# Altium PCB Portable_FIlter.PcbDoc
Units mil, origin at the board's own origin, x right, y up, seen from the top; angles counter-clockwise.
Board outline 5715 x 4225 mil, 2 copper layers (Top Layer, Bottom Layer); 66 components, 36 nets, 177 pads, 23 vias.
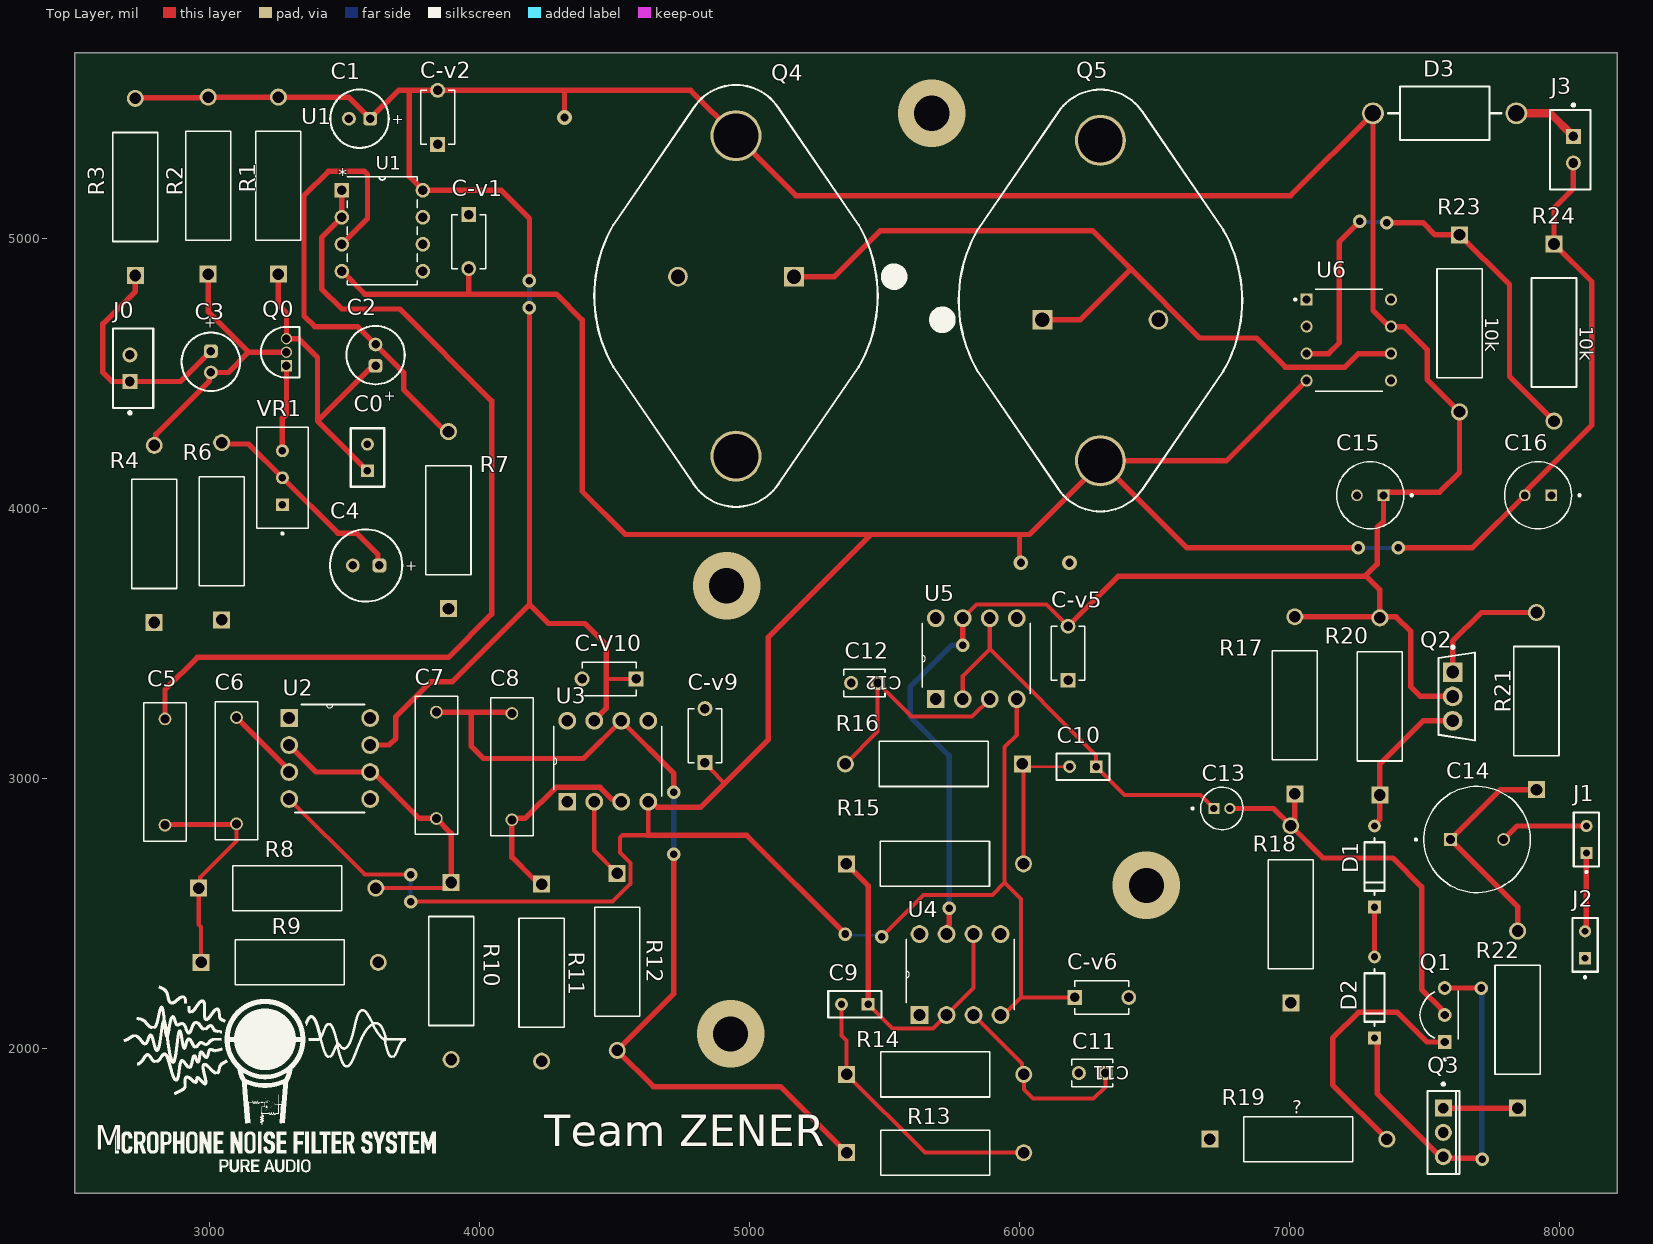
[diagram p0: Top Layer view]
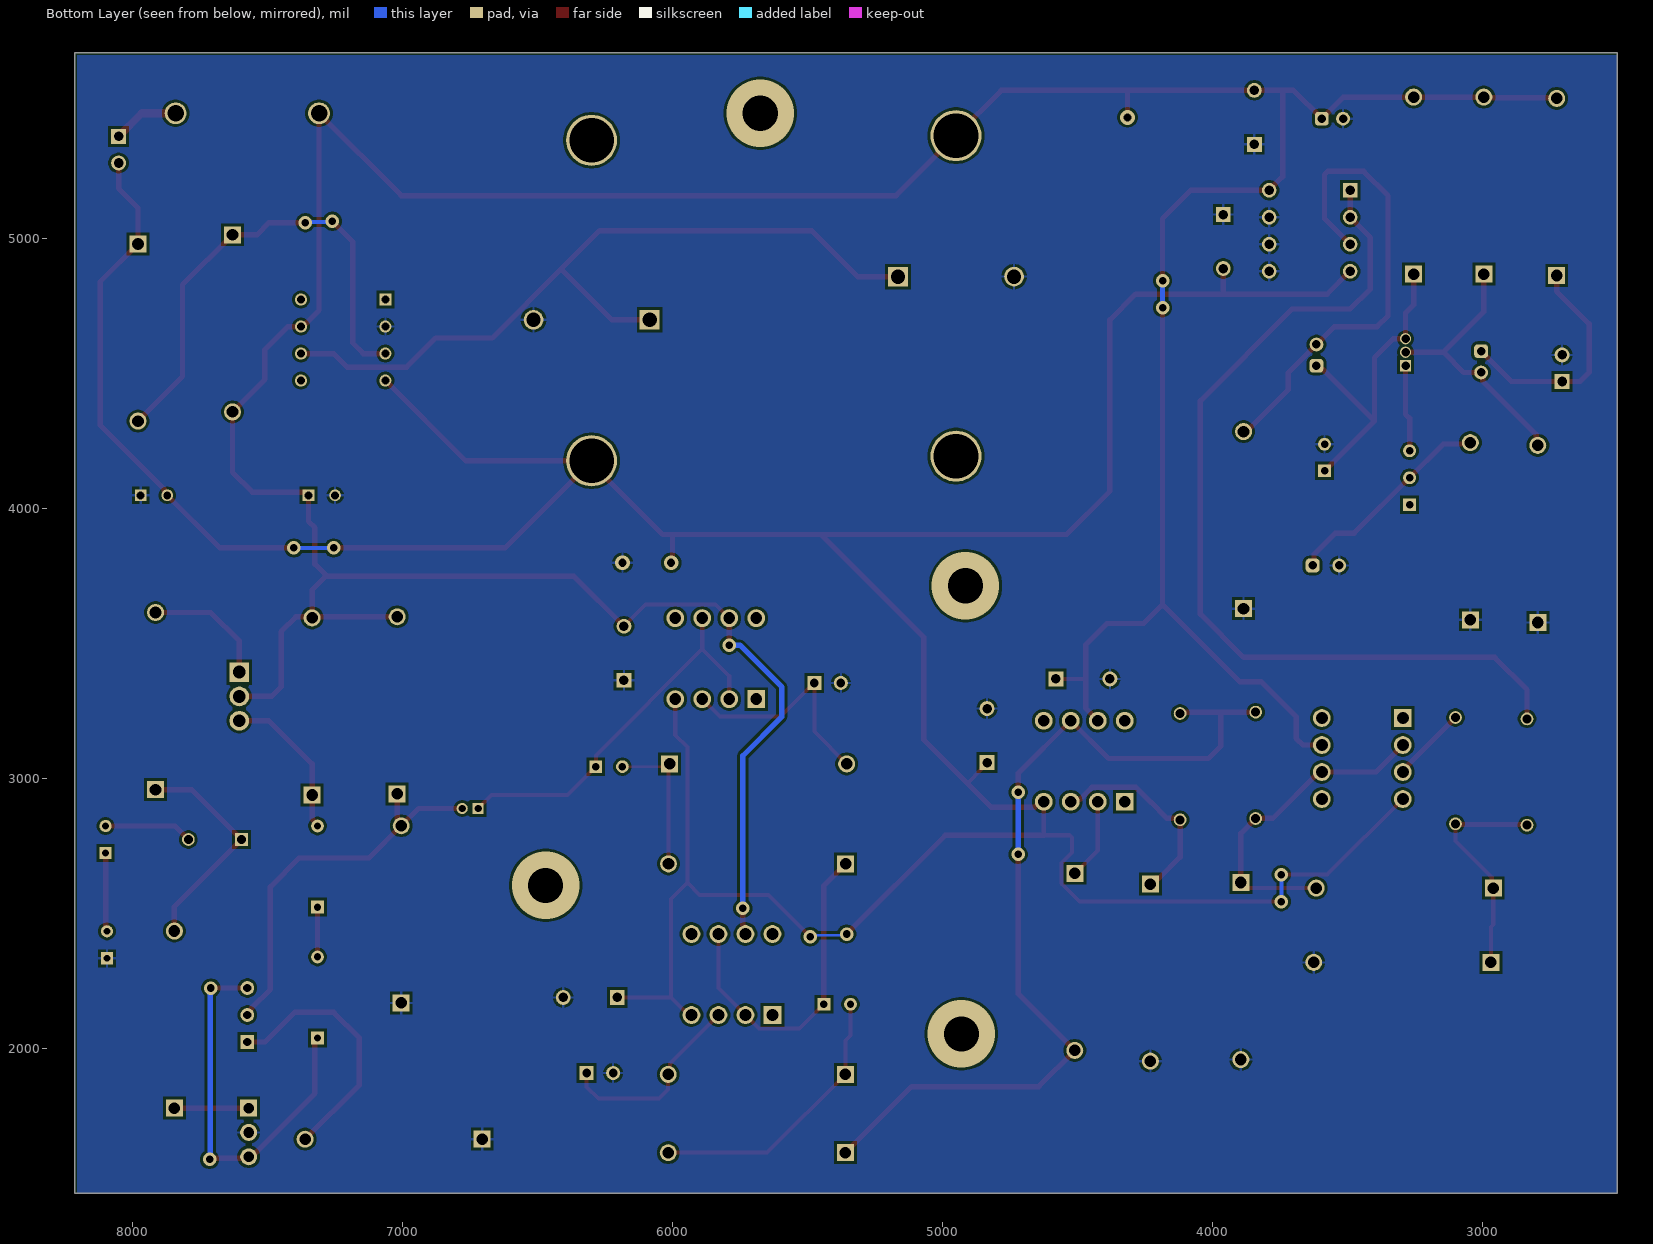
[diagram p1: Bottom Layer view, seen from below]
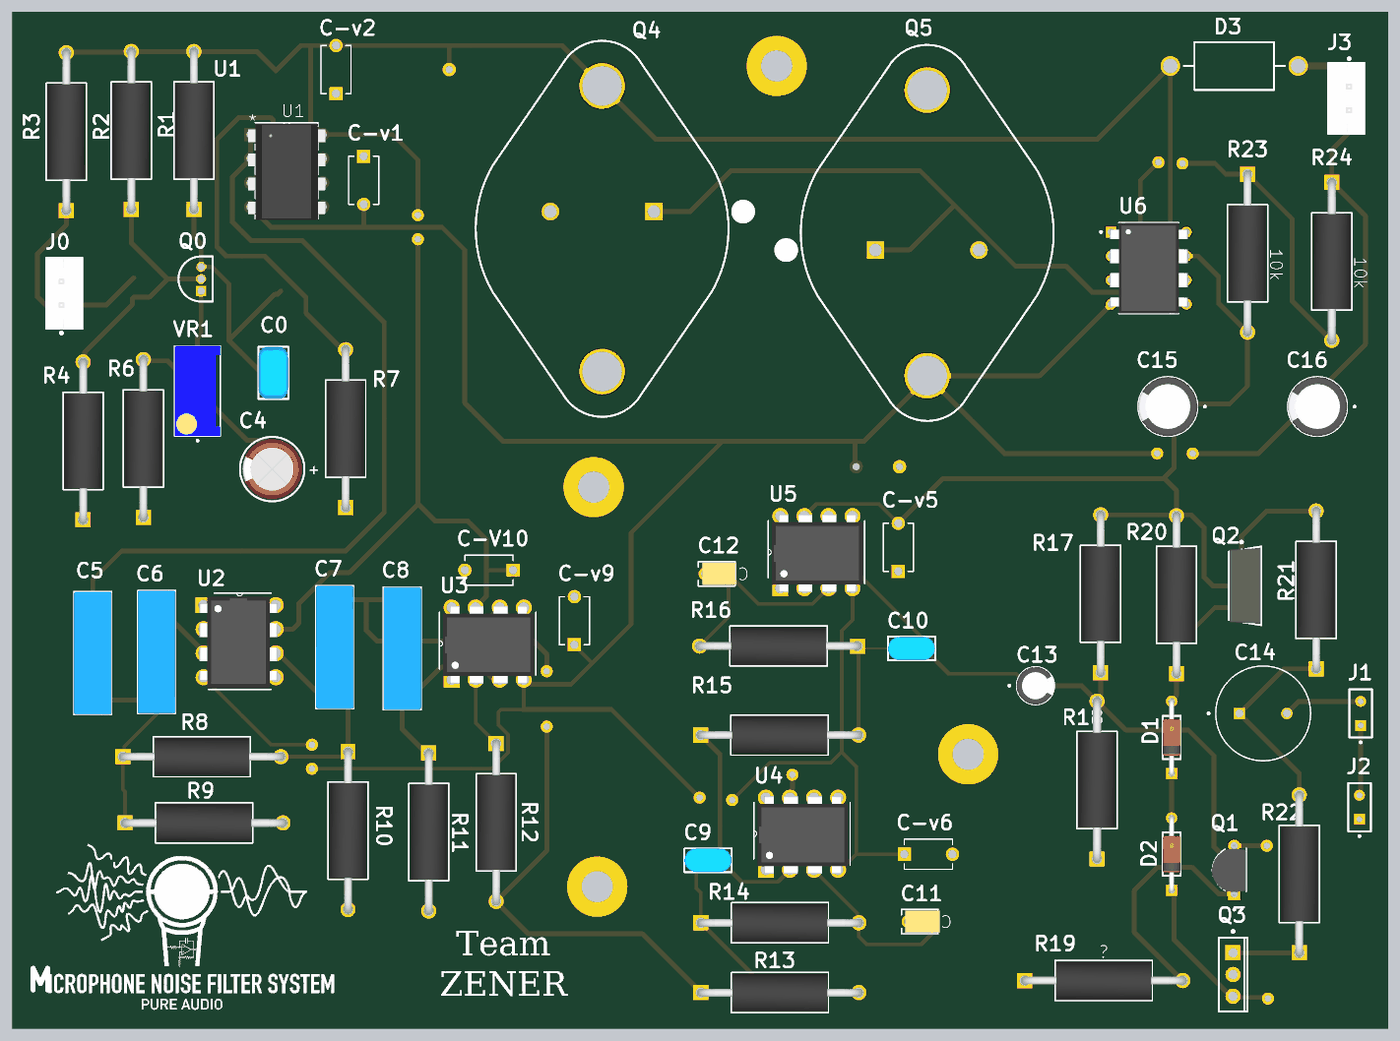
[diagram p2: 3D render of the assembled board from above, using the file's embedded part models]

## Layer stack, top to bottom
Top Solder: solder mask 0.4, Solder Resist, Dk 3.5
Top Layer: signal copper 1.4
Dielectric 1: dielectric 12.6, FR-4, Dk 4.8
Bottom Layer: signal copper 1.4
Bottom Solder: solder mask 0.4, Solder Resist, Dk 3.5

## Board outline
2500,1465 8215,1465 8215,5690 2500,5690

## Design rules (kind name [scope] priority, off if disabled: settings)
Clearance [All] p1: gap=10 ignorepadtopadclearanceinfootprint=FALSE
PolygonConnect [All] p1: connectstyle=Relief reliefconductorwidth=10 reliefentries=4 polygonreliefangle="90 Angle" airgapwidth=10
RoutingVias [All] p1: holewidth=28 width=50 viastyle="Through Hole" minholewidth=28 minwidth=50 maxholewidth=28 maxwidth=50
SolderMaskExpansion [All] p1: expansion=0 istentingtop=FALSE
SupplyNets "Schematic Supply Nets_2" [InNet('+12')] p1: voltage=0.000
SupplyNets "Schematic Supply Nets_1" [InNet('-12')] p2: voltage=0.000
SupplyNets "Schematic Supply Nets" [InNet('GND')] p3: voltage=0.000
Width [All] p1: maxlimit=20 minlimit=10 preferedwidth=20
30 further rules are at their usual default settings.

## Components (designator, comment, footprint, x,y, rotation, side; value= is the part's Value field where it differs from the comment)
C0 "0.1u" FP-RCE2A2-MFG 3585,4190 r90 top
C1 "10u" WCAP-ATLL_D5H11 53555.63,55445 r0 top
C2 "10u" WCAP-ATLL_D5H11 53615,-45430.63 r270 top
C3 "10u" WCAP-ATLL_D5H11 -46995,54544.37 r90 top
C4 "33u" WCAP-ATG5_D6.3H11 3580,3790 r0 top
C5 "470n" CAPRR1000W60L1300T400H900 2835,3025 r270 top
C6 "470n" CAPRR1000W60L1300T400H900 3100,3030 r90 top
C7 "470n" CAPRR1000W60L1300T400H900 3840,3050 r90 top
C8 "470n" CAPRR1000W60L1300T400H900 4120,3045 r270 top
C9 "15n" FP-RDE0P1-MFG 5390,2165 r180 top
C10 "15n" FP-RDE0P1-MFG 6235,3045 r180 top
C11 "10n" K103K10X7RF53L2_VIS 6318.43,1910 r180 top
C12 "10n" K103K10X7RF53L2_VIS 5475,3355 r180 top
C13 "3.3uF" CAPPRD150W45D400H700 6749.53,2890 r0 top
C14 "1000uF" CAPPRD500W60D1000H2500 7695,2775 r0 top
C15 "100uF" CAPPRD250W50D630H1120 7299.21,4050 r180 top
C16 "100uF" CAPPRD250W50D630H1120 7920.79,4050 r180 top
C-v1 "100nF" CAPRR508W50L508T318H762 3960,4990 r270 top
C-v2 "100nF" CAPRR508W50L508T318H762 3845,5450 r90 top
C-v5 "100nF" CAPRR508W50L508T318H762 6180,3465 r90 top
C-v6 "100nF" CAPRR508W50L508T318H762 6305,2190 r0 top
C-v9 "100nF" CAPRR508W50L508T318H762 4835,3160 r90 top
C-V10 "100nF" CAPRR508W50L508T318H762 4480,3370 r180 top
D1 "1N4148" FP-017AG-MFG 7315,2675 r90 top
D2 "1N4148" FP-017AG-MFG 7315,2190 r90 top
D3 "1N5408G" ONSC-AXIAL_LEAD-2-267-05_V 7575,5465 r0 top
J0 "B2B-EH(LF)(SN)" FP-B2B-EH_LF_SN-MFG 2716.81,4520.79 r90 top
J1 "TD-101-X-A" SAMTEC_TD-101-X-A 8100,2775 r0 top
J2 "TD-101-X-A" SAMTEC_TD-101-X-A 8095,2385 r0 top
J3 "B2B-EH(LF)(SN)" FP-B2B-EH_LF_SN-MFG 8040,5330 r270 top
Q0 "2N3904BU" FAIR-TO-92 3285,4530 r90 top
Q1 "2N2222A" TO92254P470H750-3 7483.27,2125 r90 top
Q2 "BD1396STU" FP-340AS-MFG 7620,3305 r0 top
Q3 "BD140" ONSC-TO-225-3-77-09 7570,1690 r0 top
Q4 "2N3055G" ONSC-TO-204-3-1-07 4950.04,4788.54 r270 top
Q5 "MJ2955G" ONSC-TO-204-3-1-07 6300,4771.5 r90 top
R1 "2k" RES_VISHAY_HVR37_VIS 3255,4869 r90 top
R2 "27k" RES_VISHAY_HVR37_VIS 2995,4869 r90 top
R3 "15k" RES_VISHAY_HVR37_VIS 2725,4864 r90 top
R4 "18k" RES_VISHAY_HVR37_VIS 2795,3579 r90 top
R6 "1.5k" RES_VISHAY_HVR37_VIS 3045,3589 r90 top
R7 "100k" RES_VISHAY_HVR37_VIS 3885,3630 r90 top
R8 "30k" RES_VISHAY_HVR37_VIS 2960,2595 r0 top
R9 "8.2k" RES_VISHAY_HVR37_VIS 2969,2320 r0 top
R10 "10k" RES_VISHAY_HVR37_VIS 3895,2616 r270 top
R11 "20k" RES_VISHAY_HVR37_VIS 4230,2610 r270 top
R12 "12k" RES_VISHAY_HVR37_VIS 4510,2650 r270 top
R13 "1.3k" RES_VISHAY_HVR37_VIS 5360,1615 r0 top
R14 "1.3k" RES_VISHAY_HVR37_VIS 5360,1905 r0 top
R15 "1.3k" RES_VISHAY_HVR37_VIS 5359,2685 r0 top
R16 "1.3k" RES_VISHAY_HVR37_VIS 6011,3055 r180 top
R17 "82k" RES_VISHAY_HVR37_VIS 7020,2944 r90 top
R18 "15k" RES_VISHAY_HVR37_VIS 7005,2170 r90 top
R19 "100" RES_VISHAY_HVR37_VIS 6705,1665 r0 top
R20 "820" RES_VISHAY_HVR37_VIS 7335,2940 r90 top
R21 "1" RES_VISHAY_HVR37_VIS 7915,2960 r90 top
R22 "1" RES_VISHAY_HVR37_VIS 7845,1780 r90 top
R23 "10k" RES_VISHAY_HVR37_VIS 7630,5015 r270 top
R24 "10k" RES_VISHAY_HVR37_VIS 7980,4981 r270 top
U1 "NE5532P" P8 3790,4880 r0 top
U2 "OP07CPZ" DIP254P762X508-8 3595,2925 r0 top
U3 "OP07CPZ" DIP254P762X508-8 4625,3215 r90 top
U4 "OP07CPZ" DIP254P762X508-8 5930,2425 r90 top
U5 "OP07CPZ" DIP254P762X508-8 5990,3595 r90 top
U6 "LM741CN/NOPB" DIP794W45P254L959H508Q8 7220,4625 r0 top
VR1 "100ohm" TRIM_3296W-1-101LF 3270,4115 r90 top

## Footprints (in the part's own frame and the unit in brackets; to place one, negate y for a bottom-side part, rotate by r counter-clockwise, add the part's x,y. Pads: shape width x height; smd on the part's side, far side on the other; paste and mask are expansions set on the pad)
CAPPRD150W45D400H700 [mm]
  round 1.05 hole 0.7: N(0.75,0)
  rect 1.05x1.05 / inner round 1.05 / far side rect 1.05x1.05 hole 0.7: P(-0.75,0)
  silkscreen extent -2.85,-2 2,2, body extent -2,-2 2,2, height 7
CAPPRD250W50D630H1120 [mm]
  round 1.1 hole 0.75: N(1.25,0)
  rect 1.1x1.1 hole 0.75: P(-1.25,0)
  silkscreen extent -4,-3.15 3.15,3.15, body extent -3.15,-3.15 3.15,3.15, height 11.2
CAPPRD500W60D1000H2500 [mm]
  round 1.2 hole 0.85: N(2.5,0)
  rect 1.2x1.2 / inner round 1.2 / far side rect 1.2x1.2 hole 0.85: P(-2.5,0)
  silkscreen extent -5.85,-5 5,5
CAPRR508W50L508T318H762 [mm]
  rect 1.398x1.398 / inner round 1.398 / far side rect 1.398x1.398 hole 0.89: 1(-2.54,0)
  round 1.398 hole 0.89: 2(2.54,0)
  silkscreen extent -2.54,-1.59 2.54,1.59
CAPRR1000W60L1300T400H900 [mm]
  round 1.2 hole 0.85: 1(-5,0) 2(5,0)
  silkscreen extent -6.5,-2 6.5,2, body extent -6.5,-2 6.5,2, height 9
DIP254P762X508-8 [mil]
  rect 66x66 / inner round 66 / far side rect 66x66 hole 44: 1(-300,300)
  round 66 hole 44: 2(-300,200) 3(-300,100) 4(-300,0) 5(0,0) 6(0,100) 7(0,200) 8(0,300)
  silkscreen extent -280,-50 -20,350, body extent -317,-42 7,335, height 210
DIP794W45P254L959H508Q8 [mm]
  rect 1.14x1.14 / inner round 1.14 / far side rect 1.14x1.14 hole 0.74 mask+0.102: 1(-3.97,3.81)
  round 1.14 hole 0.74 mask+0.102: 2(-3.97,1.27) 3(-3.97,-1.27) 4(-3.97,-3.81) 5(3.97,-3.81) 6(3.97,-1.27) 7(3.97,1.27) 8(3.97,3.81)
  silkscreen extent -5.13,-4.8 3.18,4.8, body extent -4.09,-4.79 4.1,4.79, height 5.08
FAIR-TO-92 [mm] "TO, 3-Leads, Body Dia 4.79mm, Pitch 1.27mm"
  rect 1.05x1.05 hole 0.8 mask+0.05: 1(0,0)
  round 1.05 hole 0.8 mask+0.05: 2(1.27,0) 3(2.54,0)
  silkscreen extent -1.11,-1.21 3.65,2.4, body extent -1.11,-1.21 3.65,2.4, height 5.33
FP-017AG-MFG [mm]
  rect 1.2x1.2 hole 0.7 paste-2539.97 mask+0: 1(-3.813,0)
  round 1.2 hole 0.7 paste-2539.97 mask+0: 2(3.813,0)
  silkscreen extent -2.68,-0.95 2.68,0.95, body extent -4.51,-1.05 4.51,1.05, height 0.25
FP-340AS-MFG [mm]
  rect 1.85x1.85 hole 1.2 paste-2539.97 mask+0: 1(-0.387,2.29)
  round 1.85 hole 1.2 paste-2539.97 mask+0: 2(-0.387,0) 3(-0.387,-2.29)
  silkscreen extent -1.73,-4.15 1.73,4.75, body extent -1.83,-4.25 1.83,4.25, height 0.25
FP-B2B-EH_LF_SN-MFG [mm]
  rect 1.4x1.4 hole 0.9 paste-2539.97 mask+0: 1(-1.25,0.3)
  round 1.4 hole 0.9 paste-2539.97 mask+0: 2(1.25,0.3)
  silkscreen extent -4.32,-1.9 3.75,1.9, body extent -3.85,-2 3.85,2, height 0.25
FP-RCE2A2-MFG [mm]
  rect 1.2x1.2 hole 0.7 paste-2539.97 mask+0: 1(-1.25,0)
  round 1.2 hole 0.7 paste-2539.97 mask+0: 2(1.25,0)
  silkscreen extent -2.75,-1.58 2.75,1.58, body extent -2.85,-1.68 2.85,1.68, height 0.25
FP-RDE0P1-MFG [mm]
  rect 1.2x1.2 hole 0.7 paste-2539.97 mask+0: 1(-1.25,0)
  round 1.2 hole 0.7 paste-2539.97 mask+0: 2(1.25,0)
  silkscreen extent -2.5,-1.25 2.5,1.25, body extent -2.6,-1.35 2.6,1.35, height 0.25
K103K10X7RF53L2_VIS [mil]
  rect 52x52 hole 32 paste-99999 mask+0: 1(0,0)
  round 52 hole 32 paste-99999 mask+0: 2(98.43,0)
  silkscreen extent -27,-50 125,50, body extent -33,-46 109,46, height 142
ONSC-AXIAL_LEAD-2-267-05_V [mm] "AXIAL, 2-Leads, Diameter 5.05mm"
  round 2.05 hole 1.55: 1(-6.745,0) 2(6.745,0)
  silkscreen extent -5.32,-2.53 5.32,2.52
ONSC-TO-204-3-1-07 [mm] "TO-204, Pin Spacing 10.92mm, Lead Dia. 1.09 mm (max)"
  rect 1.85x1.85 hole 1.35: 1(-1.815,5.46)
  round 1.85 hole 1.35: 2(-1.815,-5.46)
  round 4.8 hole 4.19 mask+0.102: 3(-15.075,0) 4(15.075,0)
  silkscreen extent -19.85,-13.33 19.85,15.5, body extent -19.84,-13.33 19.84,13.33, height 8.51
ONSC-TO-225-3-77-09 [mm] "FM, 3-Leads, Body 7.8x3mm, Pitch 2.29mm"
  rect 1.6x1.6 hole 1: 1(0,2.29)
  round 1.6 hole 1: 2(0,0) 3(0,-2.29)
  silkscreen extent -1.49,-3.9 1.51,4.67, body extent -1.49,-3.9 1.51,3.9, height 13.64
P8 [mil]
  rect 54x54 hole 34 paste-99999 mask-27: 1(-300,300)
  round 54 hole 34 paste-99999 mask-27: 2(-300,200) 3(-300,100) 4(-300,0) 5(0,0) 6(0,100) 7(0,200) 8(0,300)
  silkscreen extent -280,-50 -20,350, body extent -310,-55 10,345, height 205
RES_VISHAY_HVR37_VIS [mil]
  rect 63x63 / inner round 60 / far side rect 63x63 hole 43 paste-99999 mask+0: 1(0,0)
  round 63 / inner round 60 / far side round 63 hole 43 paste-99999 mask+0: 2(656,0)
  silkscreen extent 126,-83 530,84, body extent -16,-78 673,78, height 157
SAMTEC_TD-101-X-A [mil]
  rect 45x45 / inner round 45 / far side rect 45x45 hole 25: 01(0,-50)
  round 45 hole 25: 02(0,50)
  silkscreen extent -47,-124 47,100
TO92254P470H750-3 [mm]
  rect 1.298x1.298 / inner round 1.298 / far side rect 1.298x1.298 hole 0.79 mask+0.102: 1(-2.54,-2.33)
  round 1.298 hole 0.79 mask+0.102: 2(0,-2.33) 3(2.54,-2.33)
  silkscreen extent -4.29,-3.6 2.3,0, body extent -2.79,-3.58 2.69,0.02, height 8.09
TRIM_3296W-1-101LF [mm]
  rect 1.218x1.218 / inner round 1.218 / far side rect 1.218x1.218 hole 0.71: 1(-2.54,0)
  round 1.218 hole 0.71: 2(0,0) 3(2.54,0)
  silkscreen extent -5.35,-2.41 4.76,2.42, body extent -4.76,-2.41 4.76,2.42, height 11.55
WCAP-ATG5_D6.3H11 [mm] "Aluminum Electrolytic Capacitors, 6.3x11mm"
  rrect50% 1.3x1.3 hole 0.8: 1(1.25,0)
  round 1.3 hole 0.8: 2(-1.25,0)
  silkscreen extent -3.4,-3.4 3.4,3.4, body extent -3.14,-3.15 3.15,3.15, height 11.31
WCAP-ATLL_D5H11 [mm] "Aluminum Electrolytic Capacitors, 5x11mm"
  rrect50% 1.3x1.3 hole 0.8: 1(-1269,-1270)
  round 1.3 hole 0.8: 2(-1271,-1270)
  silkscreen extent -1272.75,-1272.75 -1267.25,-1267.25, body extent -1272.49,-1272.5 -1267.5,-1267.5, height 11.31

## Part data
C0: library part CMP-06035-054740-1, "Cap Ceramic 100nF 50V C0G ±5% Radial 2.5mm +125°C Automotive Ammo Pack"
C1 C2 C3: library part CMP-03913-53914479-2, "Alum. Electrolytic Cap 10UF 50V 5MM Radial Wcap-atll, Lifetime 4000H +105OC", Capacitance=10µF, Case/Package=Radial, Leakage Current=5µA, Max Operating Temperature=105°C, Min Operating Temperature=-55°C, Ripple Current=120mA, Tolerance=20%, Voltage Rating=50V, Diameter=5mm, Height=11mm, Height - Seated (Max)=12.4968mm, Impedance=2.6Ω, Lead Pitch=2.0066mm, Length=11mm, Life (Hours)=4000hours, Material=Aluminium, Mount="Through Hole", Packaging="Tape & Box (TB)", Pitch=2mm, Polarity=Polar, REACH SVHC=Unknown, RoHS=Compliant, Voltage Rating (DC)=50V
C4: library part CMP-03913-53914205-2, "WCAP-ATG5 Aluminum Electrolytic Capacitors", Capacitance=68µF, Case/Package=Radial, Leakage Current=23.8µA, Max Operating Temperature=105°C, Min Operating Temperature=-40°C, Ripple Current=140mA, Tolerance=20%, Voltage Rating=35V, Diameter=6.3mm, Height=11mm, Height - Seated (Max)=12.4968mm, Lead Pitch=2.4892mm, Length=11mm, Life (Hours)=2000hours, Mount="Through Hole", Packaging="Tape & Box (TB)", Pitch=2.5mm, Polarity=Polar, RoHS=Compliant, Voltage Rating (DC)=35V
C5 C6 C7 C8: library part B32521C1474J000, "0.47 ÂµF Film Capacitor 63V 100V Polyester, Polyethylene Terephthalate (PET), Metallized - Stacked Radial", Package="Radial TDK", Check_prices=https://www.snapeda.com/parts/B32521C1474J000/EPCOS/view-part/?ref=eda, MF=EPCOS, MP=B32521C1474J000, SnapEDA_Link=https://www.snapeda.com/parts/B32521C1474J000/EPCOS/view-part/?ref=snap
C9 C10: library part CMP-06035-018366-1, "Ceramic Capacitor 15nF ±10% 100V X7R Radial", Capacitance=15nF, Case/Package=Radial, Dielectric=X7R, Max Operating Temperature=125°C, Min Operating Temperature=-55°C, Package Quantity=1, Resistor Type=Ceramic, Tolerance=10%, Voltage Rating=100V, Height=3.5mm, Height - Seated (Max)=0.236inch, Lead Diameter=0.5mm, Lead Pitch=0.098inch, Lead/Base Style="Formed Leads", Length=0.157inch, Mount="Through Hole", Packaging="Cut Tape", Termination=Radial, Voltage Rating (DC)=100V, Width=0.098inch
C11 C12: library part K103K10X7RF53L2, "K 50V 10nF Â±10% X7R BULK e3", Manufacturer_Name=Vishay, Copyright="Copyright (C) 2026 Ultra Librarian. All rights reserved.", Datasheet=https://www.vishay.com/doc?45171, Manufacturer_Part_Number=K103K10X7RF53L2, Type="Ceramic Capacitor"
C13: library part ECEA1EKN3R3, "Aluminum Electrolytic Capacitors, KA-A (Bi-polar) Series, 3.3uF +/- 20%, 25V, Radial lead type(4x7mm)", Package="RADIAL-2 Panasonic", Check_prices=https://www.snapeda.com/parts/ECE-A1EKN3R3/Panasonic/view-part/?ref=eda, MF=Panasonic, MP=ECE-A1EKN3R3, SnapEDA_Link=https://www.snapeda.com/parts/ECE-A1EKN3R3/Panasonic/view-part/?ref=snap
C14: library part EEUFR1E102LB_1, "FR-A", Package=None, Availability=Unavailable, MF="{'manufacturer': u'Panasonic Electronic Components'}", MP=EEUFR1E102LB, Price=None
C15 C16: library part EEUHD1E101_1, "Ø®Ø§Ø²Ù† Ù‡Ø§ÛŒ Ø§Ù„Ú©ØªØ±ÙˆÙ„ÛŒØªÛŒ Ø¢Ù„ÙˆÙ…ÛŒÙ†ÛŒÙˆÙ…ÛŒ 100F 25V Ø´Ø¹Ø§Ø¹ÛŒØŒ Ù‚ÙˆØ·ÛŒ 1000 Ø³Ø§Ø¹Øª @ 105C", Package="RADIAL-2 Panasonic", Availability="In Stock", Check_prices=https://www.snapeda.com/parts/EEU-HD1E101/Panasonic/view-part/?ref=eda, MF=Panasonic, MP=EEU-HD1E101, Price=None, Purchase-URL=https://pricing.snapeda.com/search/part/EEU-HD1E101/?ref=eda, SnapEDA_Link=https://www.snapeda.com/parts/EEU-HD1E101/Panasonic/view-part/?ref=snap
C-v1 C-v2 C-v5 C-v6 C-v9 C-V10: library part AR215C104K4R, "AR 100nF Ceramic Multilayer Cap,50V dc,+125C,X7R Dielectric,+/-10%,Through Hole", Package="Radial AVX", Check_prices=https://www.snapeda.com/parts/AR215C104K4R/AVX/view-part/?ref=eda, MF=AVX, MP=AR215C104K4R, SnapEDA_Link=https://www.snapeda.com/parts/AR215C104K4R/AVX/view-part/?ref=snap
D1 D2: library part CMP-07163-000046-1, "DIODE GEN PURP 100V 200MA DO35", Average Rectified Current=200mA, Capacitance=4pF, Case/Package=DO-35, Current=4A, Forward Current=300mA, Forward Voltage=1V, Max Forward Surge Current (Ifsm)=1A, Max Operating Temperature=175°C, Max Power Dissipation=500mW, Max Repetitive Reverse Voltage (Vrrm)=100V, Max Reverse Current=5uA, Min Operating Temperature=-65°C, Package Quantity=2000, Contact Plating=Tin, Current Rating=200mA, Diameter=1.91mm, Element Configuration=Single, Height=4.56mm, Lead Free="Lead Free", Length=4.56mm, Max Reverse Voltage (DC)=100V, Max Surge Current=4A, Mount="Through Hole", Number of Pins=2, Output Current=200mA, Outside Diameter=1.85mm, Packaging=Bulk, Peak Non-Repetitive Surge Current=4A, Polarity=Standard, Power Dissipation=500mW, Radiation Hardening=No, REACH SVHC="No SVHC", Recovery Time=4ns, Reverse Recovery Time=4ns, Reverse Voltage=100V, Series=-, Voltage=100V, Voltage Rating (DC)=100V, Weight=0.01lb, Width=1.91mm
D3: library part CMP-0902-00036-1, "Standard Recovery Rectifier, 2-Pin Axial_Lead, Pb-Free, Bulk Box", Manufacturer="On Semiconductor", ComponentLink1Description="Manufacturer URL", ComponentLink1URL=http://www.onsemi.com/, ComponentLink2Description=Datasheet, ComponentLink2URL=http://www.onsemi.com/pub_link/Collateral/1N5400-D.PDF, ComponentLink3Description="Package Specification", ComponentLink3URL=http://www.onsemi.com/pub_link/Collateral/267-05.PDF, DatasheetVersion="Rev. 10", IFSM Max (A)=200, IO(rec) Max (A)=3, Mounting Technology="Through Hole", PackageDescription="2-Pin, Axial Lead, Diameter 5.05 mm", PackageReference=AXIAL_LEAD-2-267-05, PackageVersion="Rev. G, 06/2000", Packing="Bulk Box", PartNumber=1N5408G, RoHS=TRUE, Type="Standard Recovery", VRRM Max (V)=1000
J0 J3: library part CMP-17439-000683-1, "Connector Header, EH Series, 2 Position, 2.5mm, Through Hole, Press-Fit, Solder, Natural", Current Rating=3A, Voltage Rating=250V, Contact Material=Brass, Lead Free="Lead Free", Mount="Through Hole", Number of Contacts=2, Number of Positions=2, Number of Rows=1, Orientation=Straight, Pitch=2.5mm, Series=EH, Termination=Solder
J1 J2: "2 Position Header Connector Male Pin Gold", Package=None, Check_prices=https://www.snapeda.com/parts/TD-101-G-A/Samtec+Inc./view-part/?ref=eda, MF="Samtec Inc.", MP=TD-101-G-A, SnapEDA_Link=https://www.snapeda.com/parts/TD-101-G-A/Samtec+Inc./view-part/?ref=snap
Q0: library part CMP-2000-04944-1, "NPN General-Purpose Amplifier, 40 V VCEO, 0.2 A, -55 to 150 degC, 2-Pin TO-92, RoHS, Bulk", Manufacturer=FairchildSemiconductor, Maximum Collector Base Voltage=60V, Maximum Collector Emitter Saturation Voltage=0.2@1mA@10mA, Maximum Collector Emitter Voltage=40V, Maximum DC Collector Current=0.2A, Maximum Operating Frequency=300(Min)MHz, Maximum Power Dissipation=625mW, Minimum DC Current Gain=40@0.1mA@1V, Operating Temperature=-55to150degC, Package=3TO-92, Package Description="3-Pin Transistor Outline Package, Body Dia 4.79 mm, Pitch 1.27 mm", Package Reference=TO-92, Category=GPBJT, Datasheet URL=https://datasheet.ciiva.com/4722/2n3904-82270-4722369.pdf, Datasheet Version="Rev. 1.1.0, 10/2014", Manufacturer URL=https://www.fairchildsemi.com/, Mounting=ThroughHole, Packaging=Bulk, Pin Count=3, Rad Hard=No, Type=NPN
Q1: "BJT, TO-92, 40V, 600mA, NPN, 0.625W, 150Â°C", Package="TO-92 Diotec", Check_prices=https://www.snapeda.com/parts/2N2222A/Diotec/view-part/?ref=eda, MF="Diotec Semiconductor", MP=2N2222A, SnapEDA_Link=https://www.snapeda.com/parts/2N2222A/Diotec/view-part/?ref=snap
Q2: library part CMP-00278-84408977-1, "BD1396STU Bipolar Transistors - BJT NPN Si Transistor Epitaxial", Case/Package=TO-126-3, Collector Base Voltage (VCBO)=80V, Collector Emitter Saturation Voltage=500mV, Current Rating=1.5A, Emitter Base Voltage (VEBO)=5V, Manufacturer Lifecycle Status=OBSOLETE, Max Junction Temperature (Tj)=150°C, Max Power Dissipation=12.5W, Min Operating Temperature=-55°C, Power Dissipation=1.25W, Collector Emitter Breakdown Voltage=80V, Collector Emitter Voltage (VCEO)=80V, Contact Plating=Tin, Element Configuration=Single, Height=11.2mm, hFE Min=40, Lead Free="Lead Free", Length=8.3mm, Lifecycle Status=Obsolete, Max Collector Current=1.5A, Max Operating Temperature=150°C, Mount="Through Hole", NexarPartId=84408977, Number of Elements=1, Number of Pins=3, Polarity=NPN, REACH SVHC="No SVHC", RoHS=Compliant, Voltage Rating (DC)=80V, Weight=761mg, Width=3.45mm
Q3: library part CMP-1048-00039-1, "Plastic Medium-Power Silicon PNP Transistor, 3-Pin TO-225, Bulk Box", Manufacturer="On Semiconductor", ComponentLink1Description="Manufacturer URL", ComponentLink1URL=http://www.onsemi.com/, ComponentLink2Description=Datasheet, ComponentLink2URL=http://www.onsemi.com/pub_link/Collateral/BD136-D.PDF, ComponentLink3Description="Package Specification", ComponentLink3URL=http://www.onsemi.com/pub_link/Collateral/77-09.PDF, DatasheetVersion="Rev. 15", IC Continuous (A)=1.5, Mounting Technology="Through Hole", PackageDescription="3-Pin Flange Mount, Vertical Straight Lead, Body 7.6 x 2.7 mm, Pitch 2.29 mm", PackageReference=TO-225-3-77-09, PackageVersion="Rev. AC, 12/2013", Packing="Bulk Box", PartNumber=BD140, Polarity=PNP, RoHS=FALSE
Q4: library part CMP-1048-01043-1, "Complementary Silicon Power Transistor, 3-Pin TO-204, Pb-Free, Tray", Manufacturer="On Semiconductor", ComponentLink1Description="Manufacturer URL", ComponentLink1URL=http://www.onsemi.com/, ComponentLink2Description=Datasheet, ComponentLink2URL=http://www.onsemi.com/pub_link/Collateral/2N3055-D.PDF, ComponentLink3Description="Package Specification", ComponentLink3URL=http://www.onsemi.com/pub_link/Collateral/1-07.PDF, DatasheetVersion="Rev. 6", fT Min (MHz)=2.5, IC Continuous (A)=15, Mounting Technology="Through Hole", PackageDescription="2-Pin Transistor Outline, Body 39.37 x 26.67 mm, Pitch 10.92 mm", PackageReference=TO-204-3-1-07, PackageVersion="Rev. Z, 05/1988", Packing=Tray, PartNumber=2N3055G, Polarity=NPN, RoHS=TRUE
Q5: library part CMP-1048-01033-1, "Complementary Silicon Power Transistor, 3-Pin TO-204, Pb-Free, Tray", Manufacturer="On Semiconductor", ComponentLink1Description="Manufacturer URL", ComponentLink1URL=http://www.onsemi.com/, ComponentLink2Description=Datasheet, ComponentLink2URL=http://www.onsemi.com/pub_link/Collateral/2N3055-D.PDF, ComponentLink3Description="Package Specification", ComponentLink3URL=http://www.onsemi.com/pub_link/Collateral/1-07.PDF, DatasheetVersion="Rev. 6", fT Min (MHz)=2.5, IC Continuous (A)=15, Mounting Technology="Through Hole", PackageDescription="2-Pin Transistor Outline, Body 39.37 x 26.67 mm, Pitch 10.92 mm", PackageReference=TO-204-3-1-07, PackageVersion="Rev. Z, 05/1988", Packing=Tray, PartNumber=MJ2955G, Polarity=PNP, RoHS=TRUE
R1 R2 R3 R4 R6 R7 R8 R9 R10 R11 R12 R13 R14 R15 R16 R17 R18 R19 R20 R21 R22 R23 R24: library part HVR3700001004FR500, "1% 1/2W Metal Flim", Manufacturer_Name=Vishay, Copyright="Copyright (C) 2025 Ultra Librarian. All rights reserved."
U1: "Dual, 30-V, 10-MHz, low-noise operational amplifier for audio applications 8-PDIP 0 to 70", Manufacturer_Name="Texas Instruments", Copyright="Copyright (C) 2026 Ultra Librarian. All rights reserved.", Manufacturer_Part_Number=NE5532P, RefDes=RefDes, Type=Type
U2 U3 U4 U5: "Ultralow Offset Voltage Op Amp", Package="PDIP-8 Analog Devices", Check_prices=https://www.snapeda.com/parts/OP07CPZ/Analog+Devices/view-part/?ref=eda, MF="Analog Devices", MP=OP07CPZ, SnapEDA_Link=https://www.snapeda.com/parts/OP07CPZ/Analog+Devices/view-part/?ref=snap
U6: "Single, 44-V, 1-MHz operational amplifier", Package="PDIP-8 Texas", Check_prices=https://www.snapeda.com/parts/LM741CN/NOPB/Texas+Instruments/view-part/?ref=eda, MF="Texas Instruments", MP=LM741CN/NOPB, SnapEDA_Link=https://www.snapeda.com/parts/LM741CN/NOPB/Texas+Instruments/view-part/?ref=snap
VR1: library part 3296W-1-101LF, "3/8 Sq, Thru-Hole, TRIMMER, 100 ohms, Cermet, 25 Turns, Pwr-Rtg 0.5W", Package="NON STANDARD-3 Bourns", Check_prices=https://www.snapeda.com/parts/3296W-1-101LF/Bourns/view-part/?ref=eda, MF=Bourns, MP=3296W-1-101LF, SnapEDA_Link=https://www.snapeda.com/parts/3296W-1-101LF/Bourns/view-part/?ref=snap

## Via types
v1: diameter 50, hole 28, Top Layer to Bottom Layer, 16 vias
v2: diameter 250, hole 130, Top Layer to Bottom Layer, 4 vias
v3: diameter 55, hole 30, Top Layer to Bottom Layer, 2 vias
v4: diameter 55, hole 30, Top Layer to Bottom Layer, tented top, 1 vias

## Nets (pads, with @x,y where several pads share a name; then routed paths per layer and width w, separated by ;. In a path a pad name is that pad's centre, name@x,y a point inside that pad or via, vN(x,y) a via of type N, cw(c..) or ccw(c..) an arc to the next point about the centre after c; other vN are vias at no path point)
+12: C1.1 C15.P C-v2.2 C-v5.2 C-V10.1 D3.1 Q2.2 Q4.3 R1.2 R2.2 R3.2 R17.2 R20.2 R23.2 U1.8 U2.7 U3.7 U4.7 U5.7 U6.7 | length 15030.5
  Top Layer w10: 4313.54,5550 4315,5548.54
  Top Layer w15: 4470,3370 C-V10.1 ; U5.7 5799.76,3585.24 5799.76,3604.76 5840.5,3645.5 6099.5,3645.5 C-v5.2
  Top Layer w20: R3.2@2727.5,5522.5 R2.2@2992.5,5522.5 ; R2.2 R1.2 3515,5525 C1.1 3700,5550 3740,5550 ; U2.7 3665,3125 3690,3150 3690,3230 3820,3360 3900,3360 4185,3645 ; v1(4185,4745) 4185,3645 ; v1(4185,4845) 4185,5075 4080,5180 U1.8 3740,5230 3740,5550 ; v3(4315,5450) 4315,5548.54 ; U3.7 4425,3216.43 4470,3261.43 4470,3370 4470,3495 4390,3575 4255,3575 4185,3645 ; U4.7 5738.8,2433.8 5738.8,2458.52 5740,2459.72 v1(5740,2520) ; v1(5790,3495) U5.7 ; C-v5.2 6365,3750 7280,3750 7282.5,3752.5 ; R17.2 7331,3600 R20.2 ; C15.P 7348.43,3953.43 7325,3930 7325,3795 7282.5,3752.5 ; C15.P@7360.08,4061.65 7556.65,4061.65 7630,4135 R23.2 7510,4479 7510,4590 7425,4675 U6.7 7369.57,4675 7357.13,4687.44 7356.46,4687.44 7309.45,4734.45 D3.1 7004.45,5160 5172.09,5160 Q4.3 4782.09,5550 4313.54,5550 C-v2.2 3740,5550 ; Q2.2 7485,3305 7450,3340 7450,3545 7395,3600 7339,3600 R20.2 ; 7282.5,3752.5 7335,3700 R20.2
  Top Layer w30: R3.2 R3.2@2727.5,5522.5 ; R2.2@2992.5,5522.5 R2.2
  Bottom Layer w20: v1(4185,4745) v1(4185,4845) ; v1(5740,2520) 5740,3085 5595,3230 5595,3340 5750,3495 v1(5790,3495)
-12: C16.N C-v1.2 C-v6.1 C-v9.1 J3.2 Q5.3 R24.1 U1.4 U2.4 U3.4 U4.4 U5.4 U6.4 | length 14515
  Top Layer w10: 5995,3905 6000,3900
  Top Layer w15: U2.4 3575,2645 v1(3745,2645) ; v1(3745,2545) 4492.75,2545 4559,2611.25 4559,2688.75 4520,2727.75 4520,2782.05 4528.79,2790.83 4622.5,2790.83 4625,2793.33 U3.4 ; C-v9.1@4835.87,3060 4855.02,3040.85 4855.02,3035.85 4907.93,2982.93 ; v1(5490,2415) 5645,2570 5900,2570 5945,2615 ; U4.4 5940,2125 6005,2190 ; U5.4 5990,3162.73 5945,3117.73 5945,2615 ; C-v6.1 6005,2190 ; 5945,2615 6005,2555 6005,2190
  Top Layer w20: U1.4 3575,4795 3960,4795 ; C-v1.2 3960,4795 ; 4622.5,2790.83 4989.17,2790.83 v1(5355,2425) ; U3.4@4634.48,2917.97 4657.45,2895 4820,2895 4907.93,2982.93 5070,3145 5070,3525 5450,3905 ; 6000,3900 6000,3805 v4(6005,3800) ; U6.4 6766.69,4177.99 Q5.3 ; v1(7255,3855) 6620,3855 6300,4175 Q5.3 ; v1(7402.5,3855) 7676.57,3855 C16.N 7871.57,4056.31 7882.31,4067.04 7882.31,4072.31 8120,4310 8120,4841 R24.1 7980,5115 8051.81,5186.81 J3.2 ; 3960,4795 4285,4795 4380,4700 4380,4065 4540,3905 5450,3905 ; 5450,3905 5995,3905 6037.01,3905 6300,4167.99 Q5.3
  Bottom Layer w10: v1(5355,2425) 5360,2420 5485,2420 v1(5490,2415)
  Bottom Layer w15: v1(3745,2545) v1(3745,2645) ; v1(7255,3855) v1(7402.5,3855)
GND: C0.2 C1.2 C4.2 C11.2 C12.2 C15.N C16.P C-v1.1 C-v2.1 C-v5.1 C-v6.2 C-v9.2 C-V10.2 J0.2 J2.01 Q3.2 Q4.2 Q5.2 R4.1 R6.1 R7.1 R9.2 R10.2 R11.2 R18.1 R19.1 U1.5 U1.6 U1.7 U6.2 | length 17.1
  Top Layer w20: Q4.2@4730,4855 Q4.2@4740.08,4855 ; Q3.2 Q3.2@7575,1685
  other v3: 6185,3800
Hin: C5.1 U1.1 U1.2 | length 3422.1
  Top Layer w20: C5.1 2835,3330 2955,3450 3885,3450 4045,3610 4045,4400 3705,4740 3490,4740 3415,4815 3415,5005 U1.2 U1.1
Hout: C7.2 C8.1 R12.2 R13.1 U3.6 | length 3436.3
  Top Layer w20: C7.2 3970,3246.85 ; C8.1 4115,3246.85 3970,3246.85 ; v1(4720,2720) 4720,2204 R12.2 4644,1860 5115,1860 R13.1 ; v1(4720,2950) 4720,3020 U3.6 4385,3075 4015,3075 3970,3120 3970,3246.85
  Bottom Layer w20: v1(4720,2720) v1(4720,2950)
Lout: C10.1 C13.P U5.2 U5.6 | length 1439.7
  Top Layer w15: U5.2 5790,3380 5890,3480 ; U5.6 5890,3480 ; C13.P 6670,2940 6389.21,2940 C10.1 6284.21,3085.79 5890,3480
NetC0_1: C0.1 C2.1 Q0.3 R1.1 | length 1190.9
  Top Layer w20: R1.1 3255,4755 3285,4725 Q0.3 3330,4630 3400,4560 3400,4325.79 ; C0.1 3400,4325.79 ; C2.1 3601.14,4516.14 3590.35,4516.14 3400,4325.79
NetC2_2: C2.2 R7.2 U1.3 | length 1769.8
  Top Layer w20: U1.3 3585,5075 3585,5238.28 3573.28,5250 3440,5250 3350,5160 3350,4715 3390,4675 3548.74,4675 C2.2 3720,4503.74 3720,4440 3874,4286 R7.2
NetC3_1: C3.1 J0.1 R3.1 | length 869
  Top Layer w20: R3.1 2725,4805 2605,4685 2605,4505 2638.43,4471.57 2892.83,4471.57 C3.1
NetC3_2: C3.2 Q0.2 R2.1 R4.2 | length 1019.2
  Top Layer w20: R4.2 2800.99,4240.99 2800.99,4275.99 2999.03,4474.03 2999.03,4499.03 C3.2 3070,4505 3145,4580 ; R2.1 2995,4730 3145,4580 ; Q0.2 3145,4580
NetC4_1: C4.1 R6.2 VR1.2 | length 805.1
  Top Layer w20: R6.2@3031.48,4240 3145,4240 VR1.2 3475,3910 3545,3910 3624.05,3830.95 3624.05,3795.16 C4.1
NetC5_2: C5.2 C6.1 R8.1 R9.1 | length 849.3
  Top Layer w10: R8.1 R8.1@2965.64,2600.64
  Top Layer w15: R8.1 2960,2460 2969,2451 R9.1 ; R8.1@2965.64,2600.64 2965.64,2635.64 3100,2770 C6.1
  Top Layer w20: C5.2@2835,2820.78 C5.2 2837.5,2830.65 3097.5,2830.65 C6.1
NetC6_2: C6.2 U2.3 | length 282.6
  Top Layer w20: C6.2 3295,3031.85 U2.3
NetC7_1: C7.1 R8.2 R10.1 U2.2 U2.6 | length 1221.7
  Top Layer w15: R8.2@3599.52,2595 3874,2595 R10.1
  Top Layer w20: U2.2 3395,3025 U2.6 3605,3025 3776.85,2853.15 C7.1 3895,2798.15 R10.1
NetC8_2: C8.2 R11.1 U3.3 | length 787.9
  Top Layer w20: R11.1@4232.89,2597.11 4232.89,2607.11 4208.5,2631.5 4198.5,2631.5 4120,2710 C8.2 4125.21,2853.36 4168.36,2853.36 4230,2915 4230.72,2915 4283.72,2968 4446.95,2968 4491.15,2923.8 4523.84,2923.8 U3.3@4532.64,2915
NetC9_1: C9.1 R15.1 U4.2 U4.6 | length 1243.8
  Top Layer w15: C9.1 5529.71,2074.5 5679.5,2074.5 U4.2 5830,2225 U4.6
  Top Layer w20: R15.1 5439.21,2604.79 C9.1
NetC9_2: C9.2 R13.2 R14.1 | length 1044.1
  Top Layer w15: C9.2 5340.79,2049.21 5360,2030 R14.1 5650,1615 R13.2
NetC10_2: C10.2 R15.2 R16.1 | length 550.6
  Top Layer w10: R16.1 6021,3045 C10.2
  Top Layer w15: R16.1 6015,3051 R15.2
NetC11_1: C11.1 R14.2 U4.3 | length 739.1
  Top Layer w15: U4.3 6009.82,1945.18 6009.82,1911.18 R14.2 6016,1849 6050,1815 6275,1815 6318.43,1858.43 C11.1
NetC12_1: C12.1 R16.2 U5.3 | length 837.2
  Top Layer w15: R16.2 5475,3175 C12.1@5475,3340 ; C12.1 C12.1@5475,3340 ; U5.3 5825,3230 5600,3230 5490,3340 C12.1@5475,3340
NetC13_N: C13.N Q1.2 R17.1 R18.2 | length 1465.5
  Top Layer w20: C13.N 6941,2890 R18.2 ; R17.1 7020,2852.64 7005,2837.64 R18.2 ; Q1.2 7575,2133.42 7560.72,2147.7 7560.72,2149.28 7490,2220 7490,2600 7383.61,2706.39 7124.61,2706.39 R18.2
NetC14_N: C14.N J1.02 | length 327.3
  Top Layer w20: C14.N 7843.43,2825 J1.02
NetC14_P: C14.P R21.1 R22.2 | length 832
  Top Layer w20: R22.2@7845,2441 7845,2526.57 C14.P 7781.57,2960 R21.1
NetC16_N: 
NetD1_1: D1.1 D2.2 | length 184.8
  Top Layer w20: D2.2 D1.1
NetD1_2: D1.2 Q2.3 R20.1 | length 574.1
  Top Layer w20: D1.2 7315,2830.46 7335,2850.46 7335,3055 7494.84,3214.84 Q2.3
NetD2_1: D2.1 Q1.3 Q3.3 | length 1472.6
  Top Layer w20: D2.1 7325,2029.88 7325,1835 7560.16,1599.84 Q3.3 7574.92,1594.92 7710.08,1594.92 v1(7715,1590) ; Q1.3 v1(7710,2225)
  Bottom Layer w20: v1(7710,2225) 7712.5,2222.5 7712.5,1592.5 v1(7715,1590)
NetD3_2: D3.2 J3.1 | length 246.8
  Top Layer w30: D3.2 7966.02,5465 J3.1
NetJ1_01: J1.01 J2.02 | length 292.1
  Top Layer w20: J2.02 8099.78,2439.78 8099.78,2457.46 8100,2457.68 J1.01
NetQ0_1: Q0.1 VR1.3 | length 321.2
  Top Layer w20: VR1.3 3270,4335 3285,4350 Q0.1
NetQ1_1: Q1.1 R19.2 | length 958.2
  Top Layer w20: R19.2 7160,1866 7160,2040 7255,2135 7400,2135 7510,2025 Q1.1
NetQ2_1: Q2.1 R21.2 | length 468.9
  Top Layer w20: Q2.1 7604.74,3509.74 7711,3616 R21.2
NetQ3_1: Q3.1 R22.1 | length 274.8
  Top Layer w20: Q3.1@7570.16,1780 R22.1
NetQ4_1: Q4.1 Q5.1 U6.6 | length 2916.7
  Top Layer w20: Q4.1 5315,4860 5485,5030 6270,5030 6412.5,4887.5 ; Q5.1 6225.04,4700.04 6412.5,4887.5 ; U6.6 7255,4575 7205,4525 6985,4525 6877.44,4632.56 6667.44,4632.56 6412.5,4887.5
NetR12_1: R12.1 U3.2 | length 300.2
  Top Layer w15: U3.2 4425,2735 R12.1
NetR23_1: R23.1 R24.2 U6.3 | length 1844.6
  Top Layer w20: U6.3 7145,4575 7185,4615 7185,4990 v1(7260,5065) ; v1(7360,5060) 7495,5060 7540,5015 R23.1 7815,4830 7815,4490 R24.2
  Bottom Layer w10: v1(7260,5065) v1@7262.5,5062.5 ; v1@7357.5,5062.5 v1(7360,5060)
  Bottom Layer w15: v1@7262.5,5062.5 v1@7357.5,5062.5
pads on no net: Q4.4 Q5.4 U2.1 U2.5 U2.8 U3.1 U3.5 U3.8 U4.1 U4.5 U4.8 U5.1 U5.5 U5.8 U6.1 U6.5 U6.8 VR1.1
copper on no net:
  other v2: 4930,2055 6470,2605 4915,3715 5675,5465

## Polygon pours and split planes (outlines as drawn)
GND on Bottom Layer "GND_L02_P000" (solid, pour order 0): 2500,5680 2500,1465 8205,1465 8205,5680

## Silkscreen, mask and mechanical layers (free items; w line width, h text height)
Top Overlay:
  drawing of 44 lines, arcs and shapes, not listed
  text "M" at 2575.01,1625 h90
  text "Team ZENER" at 4239.21,1600 h200
Mechanical 1:
  lines w10: 2500,1455 8220,1455 8220,5690 2500,5690 2500,1455

## Text inside footprints (layer, text, board x,y; h text height)
C1: Top Overlay "+" at 3675.71,5425.31 h39.37
C2: Top Overlay "+" at 3650,4440 h39.37 r270
C3: Top Overlay "+" at 3020,4665 h39.37 r90
C4: Top Overlay "+" at 3725.67,3770.32 h39.37
R19: Top Overlay "?" at 7010,1760 h50
U1: Top Overlay "*" at 3477.5,5212 h50; Top 3D Body "*" at 3477.5,5212 h50